# Altium PCB LST_UP.PcbDoc (part 6 of 6)
Units mil, origin at the board's own origin, x right, y up, seen from the top; angles counter-clockwise.
Board outline 4330.71 x 4330.71 mil, 2 copper layers (Top Layer, Bottom Layer), stack 50 mil thick; 469 components, 244 nets, 1341 pads, 140 vias.
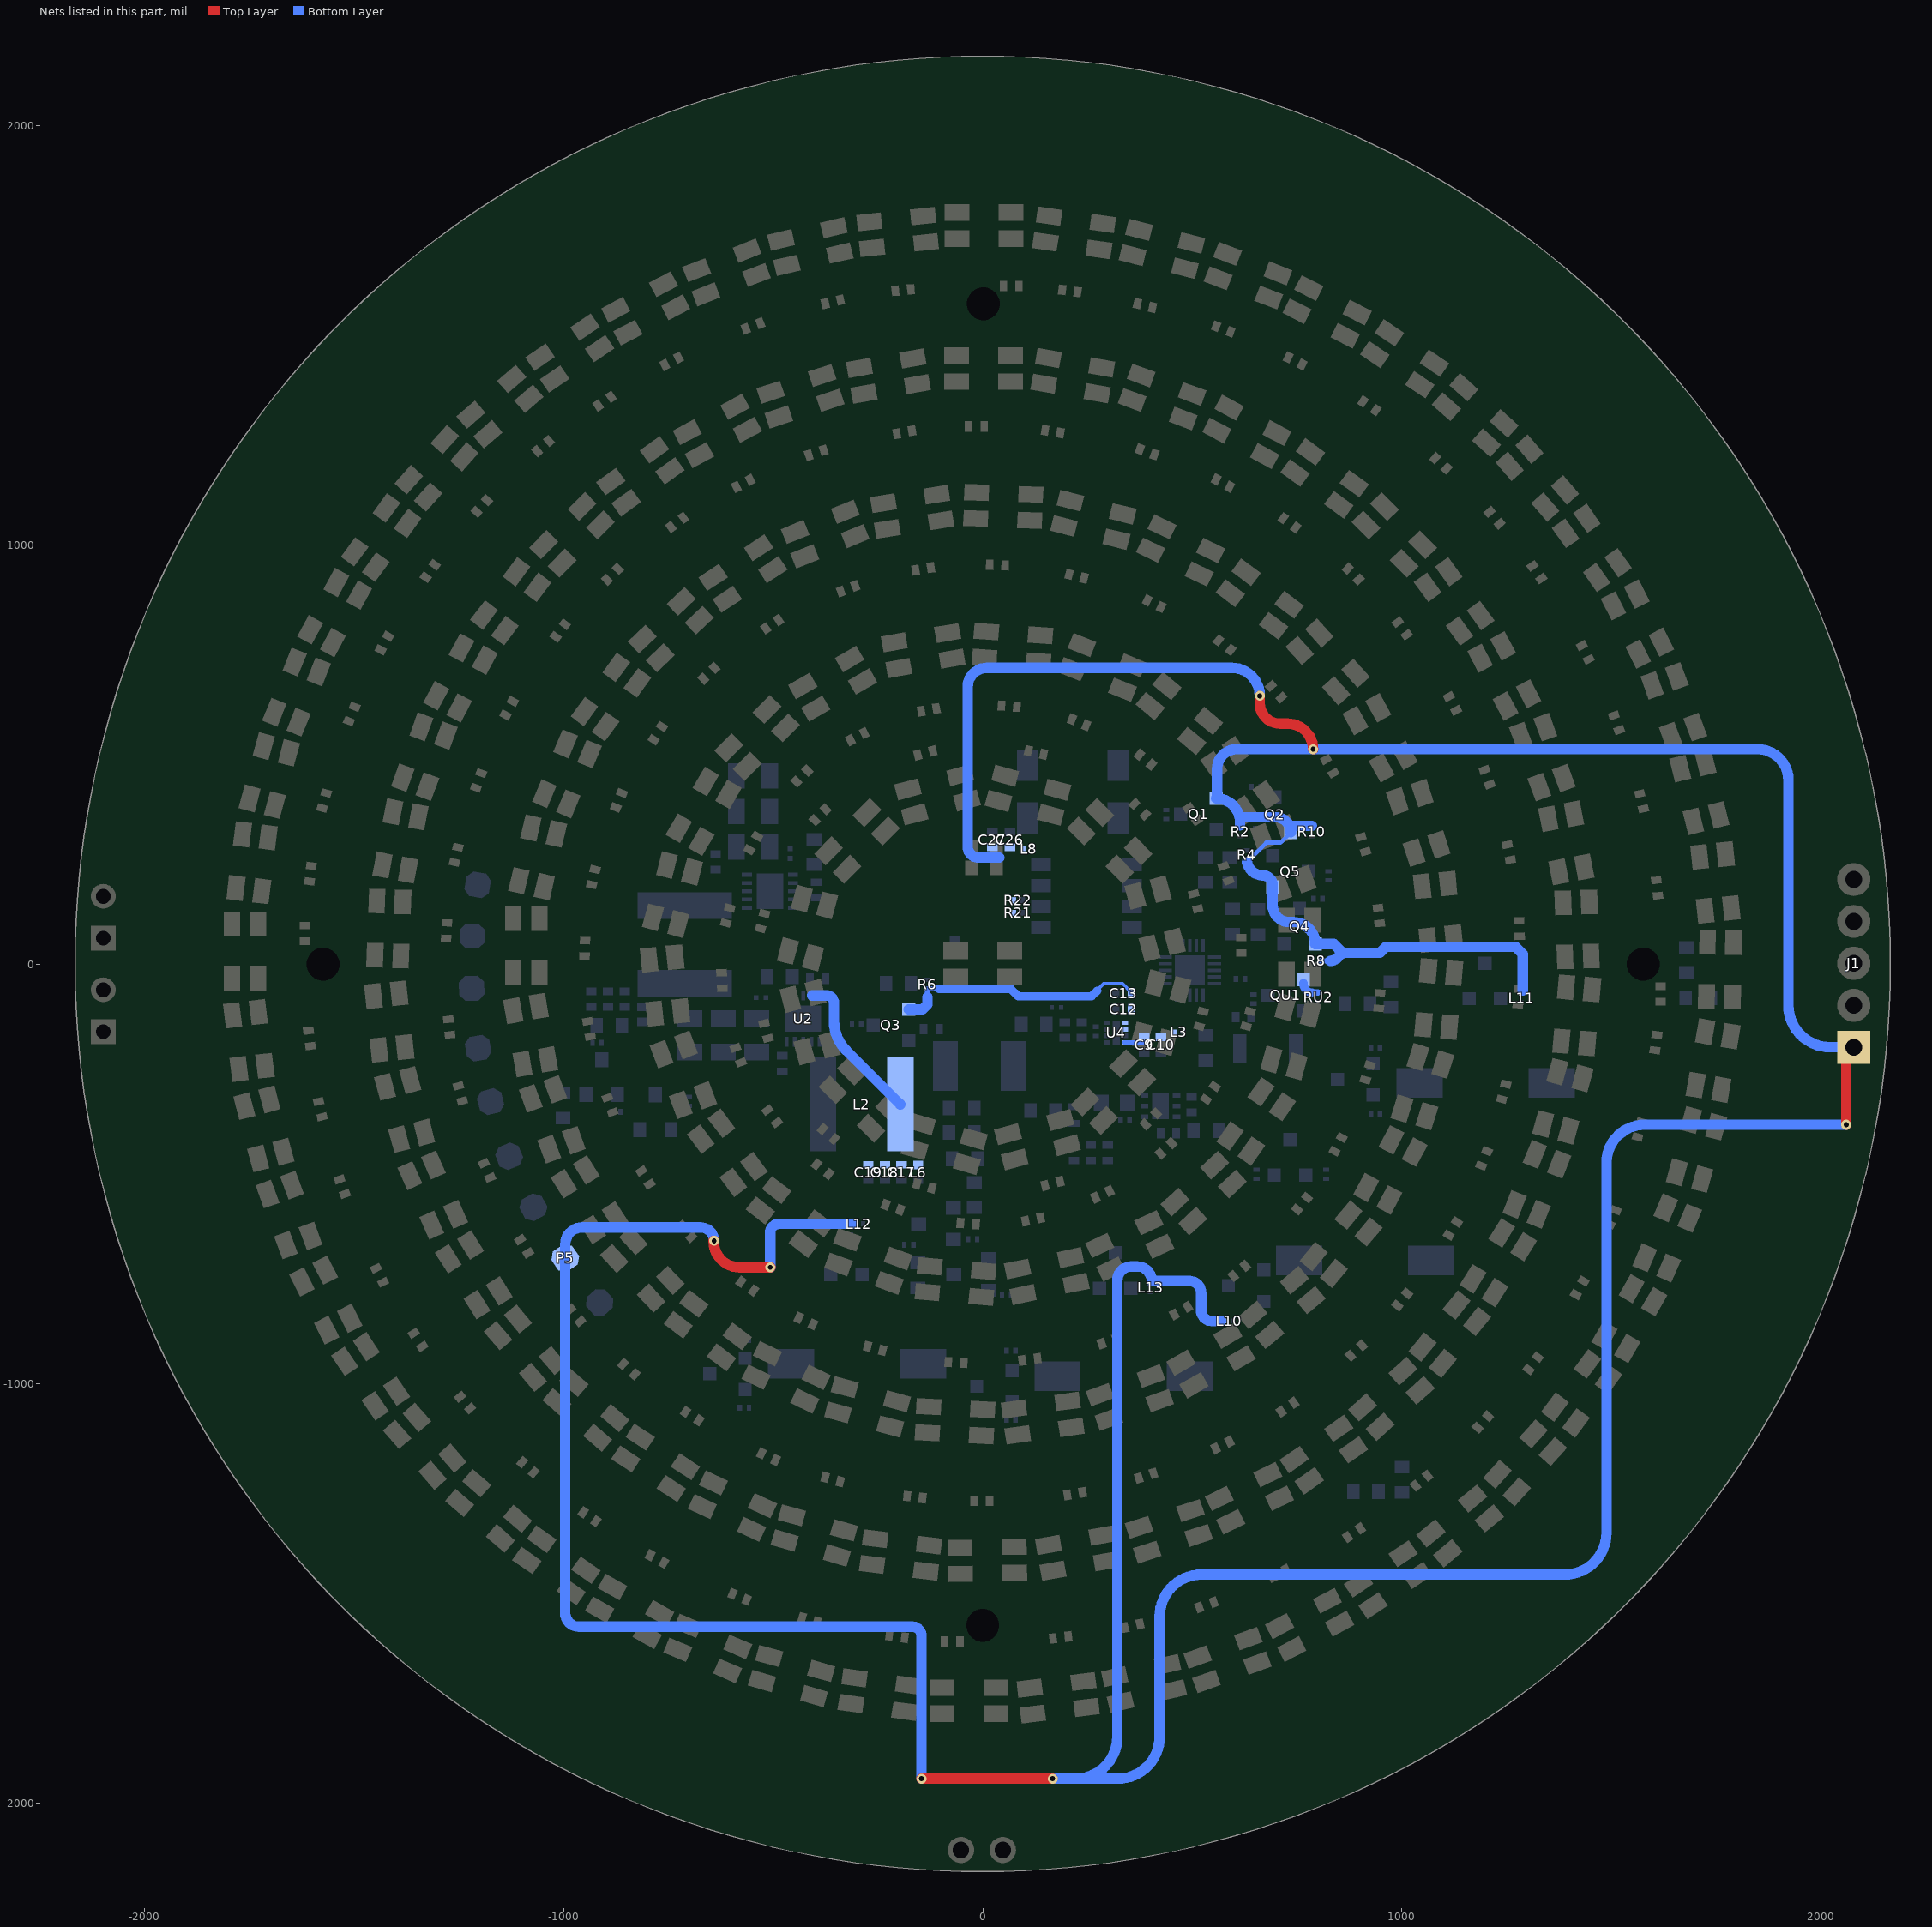
[diagram p5: the nets of this part, all layers, seen from the top]

## Via types
v1: diameter 23.62, hole 11.81, Top Layer to Bottom Layer, tented top, 92 vias
v2: diameter 23.62, hole 11.81, Top Layer to Bottom Layer, 48 vias

## Nets (pads, with @x,y where several pads share a name; then routed paths per layer and width w, separated by ;. In a path a pad name is that pad's centre, name@x,y a point inside that pad or via, vN(x,y) a via of type N, cw(c..) or ccw(c..) an arc to the next point about the centre after c; other vN are vias at no path point) (continued)
VDD: C9.2 C10.2 C12.2 C13.2 C26.2 C27.2 J1.1 L3.1 L8.1 L10.1 L11.1 L12.1 L13.1 P5.1 Q1.1 Q2.1 Q3.1 Q4.1 Q5.1 QU1.1 R2.1 R4.1 R6.1 R8.1 R10.1 R21.2 R22.2 RU2.1 U4.1 U4.2 U4.4 | length 14122
  Top Layer w25: v1(-641,-659.61) ccw(c-641,-660.61) -642,-660.61 ccw(c-580,-660.61) -580,-722.61 v1(-507,-722.61) ; v1(-146,-1942.61) v1(167,-1942.61) ; v1(661,640.39) 661,622.39 ccw(c709,622.39) 709,574.39 727,574.39 cw(c727,513.39) v1(788,513.39) ; v1(2060,-382.61) 2060,-215.61 cw(c2078,-215.61) J1.1@2078,-197.61
  Bottom Layer w8: 279,-55.61 288.38,-46.23 300,-46.23 333.2,-45.61 C13.2@354.23,-66.64
  Bottom Layer w10: U4.4@337,-186.36 U4.4@339,-186.36 385.75,-186.36 ; C13.2@354.23,-68.61 C13.2@354.23,-66.64 ; 638.23,252.07 676.28,290.12 710.06,290.12 Q2.1@734.8,314.87 ; Q5.1@691.68,184.49 Q5.1@691.68,188.39
  Bottom Layer w12: -132,-78 R6.1@-132,-58.44 -104.36,-58.44 ; QU1.1@765,-50.71 765,-44.71 QU1.1@765,-42.2 ; R8.1@806,8.39 828.9,8.39
  Bottom Layer w15: 785.43,-67.17 RU2.1@800,-67.17
  Bottom Layer w20: -104.36,-58.44 66.83,-58.44 84.39,-76 260,-76 273,-63 ; QU1.1@765,-44.71 ccw(c788.9,-44.71) 772,-61.61 ccw(c785.43,-48.18) 785.43,-67.17
  Bottom Layer w25: v1(-641,-659.61) ccw(c-673,-659.61) -673,-627.61 -956,-627.61 ccw(c-956,-667.61) -996,-667.61 P5.1@-996,-700.61 -996,-1547.58 ccw(c-963.58,-1547.58) -963.58,-1580 -168,-1580 cw(c-168,-1602) -146,-1602 v1(-146,-1942.61) ; v1(-507,-722.61) -507,-640 cw(c-486,-640) -486,-619 L12.1@-311,-619 ; Q3.1@-176.68,-107.2 -143.59,-107.2 -132,-95.61 -132,-78 ; 40,254.39 -9,254.39 cw(c-9,281.39) -36,281.39 -36,661.39 cw(c10,661.39) 10,707.39 594,707.39 cw(c594,640.39) v1(661,640.39) ; v1(167,-1942.61) 221.16,-1942.61 ; 569,-850.61 546,-850.61 cw(c546,-825.61) 521,-825.61 521,-783.26 ccw(c493.35,-783.26) 493.35,-755.61 403.46,-755.61 ccw(c368.46,-755.61) 368.46,-720.61 354.45,-720.61 ccw(c354.45,-753.9) 321.16,-753.9 321.16,-1842.61 cw(c221.16,-1842.61) 221.16,-1942.61 ; R2.1@614,331.29 614,339.02 ; 614,342.02 614,339.02 ; 630.6,243.39 ccw(c667.68,250.07) 667.68,212.39 cw(c667.68,188.39) 680.83,208.46 cw(c667.68,188.39) Q5.1@691.68,188.39 ; Q5.1@691.68,184.49 691.68,140.62 ccw(c731.32,140.62) 731.32,100.97 741.01,100.97 cw(c741.01,48.57) Q4.1@793.41,48.57 837.46,48.57 858.39,27.64 ; Q2.1@734.8,314.87 ccw(c698.63,314.87) 698.63,351.04 612.72,351.04 ; Q2.1@736,330.44 R10.1@785,330.44 ; 828.9,8.39 ccw(c828.9,33.11) 846.37,15.63 858.39,27.64 ; 1288.26,-62.34 1288.26,24.74 1271,42 962,42 947.64,27.64 858.39,27.64 ; v1(2060,-382.61) 1579,-382.61 ccw(c1579,-473.61) 1488,-473.61 1488,-1355.61 cw(c1388,-1355.61) 1388,-1455.61 522,-1455.61 ccw(c522,-1555.61) 422,-1555.61 422,-1842.61 cw(c322,-1842.61) 322,-1942.61 221.16,-1942.61 ; J1.1@2078,-197.61 2022,-197.61 cw(c2022,-97.61) 1922,-97.61 1922,439.39 ccw(c1848,439.39) 1848,513.39 v1(788,513.39) 606,513.39 ccw(c606,466.39) 559,466.39 559,398.02 cw(c557,398.02) Q1.1@557,396.02 cw(c557,339.02) 612.72,351.04 ; 612.72,351.04 cw(c557,339.02) 614,339.02
VIN: C17.1 C18.1 C19.1 L2.2 L6.2 U2.9 U2.10 | length 366.1
  Bottom Layer w25: U2.9@-407.15,-74.1 U2.10@-389,-74.1 -372.9,-74.1 cw(c-372.9,-92) -355,-92 -355,-134.58 ccw(c-255,-134.58) -347.59,-172.37 ccw(c-255,-134.58) -325.71,-205.29 -196.9,-334.1 L2.2@-196.48,-334.1
pads on no net: D1.3 D2.3 D3.3 D4.3 LED160.2 U1.8 U2.8 U3.20 U4.3

## Polygon pours and split planes (outlines as drawn)
GND on Bottom Layer "Polygonpour2" (hatched 45Degree grid 20 track 8, remove dead copper, pour order 8): -377.67,-2026.39 -631.31,-1961.39 -810.31,-1893.39 -972.31,-1811.39 -1166.31,-1692.39 -1305.31,-1580.39 -1441.31,-1456.39 -1553.31,-1311.39 -1544.31,-1348.39 -1616.31,-1253.39 -1741.06,-1076.39 -1876.31,-819.39 -1977.31,-528.39 -2030.31,-234.39 -2043.31,27.56 -2030.31,244.61 -1985.31,485.61 -1912.31,714.61 -1825.31,909.61 -1713.31,1106.61 -1500.31,1388.61 -1342.31,1546.61 -1118.31,1718.61 -838.71,1872.61 -516.31,1990.61 -326.31,2027.61 -65.32,2057.61 187.69,2054.61 435.69,2017.61 625.69,1970.61 776.69,1914.61 966.69,1828.61 1122.69,1740.61 1327.69,1593.61 1555.69,1375.61 1725.69,1158.61 1861.69,930.61 1978.69,648.59 2029.69,476.61 2060.69,297.8 2076.69,181.61 2083.69,-27.39 2070.69,-230.39 2040.69,-439.39 1930.69,-787.39 1828.69,-993.39 1732.69,-1152.39 1644.1,-1277.39 1479.69,-1462.39 1340.69,-1586.39 1147.69,-1732.39 950.76,-1841.39 817.69,-1895.39 584.69,-1987.39 297.69,-2044.39 120.69,-2063.39 -152.62,-2057.39 -349.31,-2027.39 -385.31,-2020.39 -383.31,-2020.39
no net on Bottom Layer "Bottom Layer-No Net" (solid, pour order 0): 265,-311.61
GND on Top Layer "Polygonpour1" (hatched 45Degree grid 20 track 8, remove dead copper, pour order 4): -385.36,-2034 -639,-1969 -818,-1901 -980,-1819 -1174,-1700 -1313,-1588 -1449,-1464 -1561,-1319 -1552,-1356 -1624,-1261 -1748.75,-1084 -1884,-827 -1985,-536 -2038,-242 -2051,19.95 -2038,237 -1993,478 -1920,707 -1833,902 -1721,1099 -1508,1381 -1350,1539 -1126,1711 -846.41,1865 -524,1983 -334,2020 -73.01,2050 180,2047 428,2010 618,1963 769,1907 959,1821 1115,1733 1320,1586 1548,1368 1718,1151 1854,923 1971,640.98 2022,469 2053,290.19 2069,174 2076,-35 2063,-238 2033,-447 1923,-795 1821,-1001 1725,-1160 1636.4,-1285 1472,-1470 1333,-1594 1140,-1740 943.07,-1849 810,-1903 577,-1995 290,-2052 113,-2071 -160.31,-2065 -357,-2035 -393,-2028 -391,-2028

## Other copper
Bottom Layer:
  rectangle net VDD: 55.61,-67 82,180
  rectangle net V_BAT: 70.32,-216 115,-121
  rectangle net LED_IN: -294,-162.74 -245,-127
  rectangle net VDD: 335,-157 353,-128
  rectangle net VDD: 335,-157 364,-53
  rectangle net V_MCU: 182,-157 300,-95
  rectangle net GND: -217,-839 -130,-751
  rectangle net GND: -216,-788 -181,-503
  rectangle net GND: -287.59,-557 -182,-503
  rectangle net V_O1: -174,-735 -130,-502
  rectangle net VIN: -286,-493 -142,-220
  rectangle net GND: -734,-161 -386,-95.61
  rectangle net GND: -543,131.39 -474,479.39
  rectangle net GND: 408,-325 514,-302.61
  rectangle net GND: 403,-479.61 444,-302.61
  rectangle net GND: 205,-490.61 445,-459.61
  rectangle net VDD: 33,169.39 106,296
  rectangle net VDD: 9,241 81,295.39
  rectangle net GND: 10,305.79 139.28,515.39
  rectangle net V_OUT_2: -736,244 -560,479.39
  rectangle net GND: 176,-220.61 251,-165
  rectangle net GND: 194,-218.61 324,-185
  rectangle net GND: 196,-220.61 472,-199.61
  rectangle net VDD: 354,-191.61 465,-147
  rectangle net V_OUT_1: -454,-271.44 -424,-172
  rectangle net V_OUT_1: -524,-281 -424,-234.61
  rectangle net V_OUT_1: -735,-281 -504,-171.61
  rectangle net BAT_IN: -122,-432.61 -58,-120.61
  rectangle net V_BAT: -43,-551.61 129,-179
  rectangle net V_TR_O: 451,-417.72 527,-333
  rectangle net V_TR: 265,-386.61 319,-307.61
  rectangle net V_TR: 203,-442.61 335,-358

## Silkscreen, mask and mechanical layers (free items; w line width, h text height)
Top Overlay:
  text "@" at -125,1599.39 h40 r95
  text "@" at 129,1598.39 h40 r88
  text "@" at 269,1581.39 h40 r82
  text "@" at -293,1576.39 h40 r100
  text "@" at 443,1541.39 h40 r76
  text "@" at -482,1530.39 h40 r109
  text "@" at 628,1477.39 h40 r69
  text "@" at -678,1454.39 h40 r117
  text "@" at 795,1395.39 h40 r63
  text "@" at -843,1363.39 h40 r122
  text "@" at 959,1283.39 h40 r56
  text "@" at 46,1266.39 h40 r88
  text "@" at -989,1262.39 h40 r129
  text "@" at -124,1260.39 h40 r95
  text "@" at 227,1246.39 h40 r80
  text "@" at -333,1222.39 h40 r105
  text "@" at 444,1185.39 h40 r70
  text "@" at -508,1160.39 h40 r113
  text "@" at 1126,1141.39 h40 r48
  text "@" at -1139,1127.39 h40 r134
  text "@" at 619,1105.39 h40 r62
  text "@" at -669,1074.39 h40 r120
  text "@" at 1249,1007.39 h40 r41
  text "@" at 772,1003.39 h40 r54
  text "@" at -1270,978.39 h40 r143
  text "@" at -822,965.39 h40 r130
  text "@" at -78,935.09 h40 r96
  text "@" at 98,933.39 h40 r85
  text "@" at -257,901.39 h40 r108
  text "@" at 282,894.39 h40 r76
  text "@" at 917,876.39 h40 r45
  text "@" at 1344,873.39 h40 r35
  text "@" at -957,829.39 h40 r140
  text "@" at -439,828.39 h40 r120
  text "@" at 457.84,817.39 h40 r62
  text "@" at -1383,813.39 h40 r150
  text "@" at 1024,743.39 h40 r36
  text "@" at -594,722.39 h40 r130
  text "@" at 613,710.39 h40 r53
  text "@" at 1452,681.39 h40 r27
  text "@" at -1082,659.39 h40 r152
  text "@" at -1466,646.39 h40 r156
  text "@" at -66,602.39 h40 r97
  text "@" at 123,593.7 h40 r85
  text "@" at 726,592.39 h40 r40
  text "@" at -728,590.39 h40 r145
  text "@" at 1135,560.39 h40 r28
  text "@" at -238,557.39 h40 r117
  text "@" at 280,538.39 h40 r65
  text "@" at 1519,512.39 h40 r20
  text "@" at -72,501.67 h40 r100
  text "@" at -1167,491.39 h40 r160
  text "@" at 181,475.39 h40 r70
  text "@" at -378,473.39 h40 r130
  text "@" at -1538,445.39 h40 r163
  text "@" at -829,441.39 h40 r158
  text "@" at 424,436 h40 r50
  text "@" at 842,408.39 h40 r29
  text "@" at -331.03,386.39 h40 r130
  text "@" at 1208,379.39 h40 r18
  text "@" at -503,341.39 h40 r150
  text "@" at 1571,323.39 h40 r14
  text "@" at -1225,320.39 h40 r167
  text "@" at 406,314 h40 r45
  text "@" at 524,299.39 h40 r35
  text "@" at -1581,274.39 h40 r170
  text "@" at -897,264.39 h40 r166
  text "@" at 909,221.39 h40 r18
  text "@" at 1251,204.39 h40 r10
  text "@" at -581,173.39 h40 r165
  text "@" at -492,158.39 h40 r165
  text "@" at 586,154.39 h40 r20
  text "@" at -1259,140.39 h40 r177
  text "@" at -1597,136.39 h40 r176
  text "@" at 1599,118.39 h40 r6
  text "@" at -931,99.39 h40 r178
  text "@" at 504,85.39 h40 r10
  text "@" at 935,52.39 h40 r6
  text "@" at 1266,25.39 h40
  text "@" at -607,24.39 h40 r183
  text "@" at 603,-14.61 h40
  text "@" at -1261,-81.61 h40 r186
  text "@" at -933,-91.61 h40 r188
  text "@" at -514,-92.61 h40 r195
  text "@" at -1595,-113.61 h40 r183
  text "@" at 1598,-132.61 h40
  text "@" at 1257,-134.61 h40 r350
  text "@" at 924,-147.61 h40 r355
  text "@" at -590,-154.61 h40 r197
  text "@" at 599,-185.61 h40 r345
  text "@" at 487,-187 h40 r345
  text "@" at -1243,-242.61 h40 r193
  text "@" at 1580,-246.61 h40 r352
  text "@" at -897,-270.61 h40 r200
  text "@" at -1578,-281.61 h40 r193
  text "@" at -523,-303.61 h40 r212
  text "@" at 883,-313.61 h40 r343
  text "@" at 492,-343.61 h40 r325
  text "@" at -402,-351 h40 r225
  text "@" at 1213,-358.61 h40 r345
  text "@" at 343,-400.61 h40 r315
  text "@" at -1190,-429.61 h40 r200
  text "@" at -418,-437 h40 r230
  text "@" at -821,-444.61 h40 r210
  text "@" at 1534,-448.61 h40 r345
  text "@" at -1533,-468.61 h40 r200
  text "@" at 381,-468.61 h40 r313
  text "@" at 804,-477.61 h40 r332
  text "@" at -194,-493.61 h40 r254
  text "@" at 1158,-514.61 h40 r338
  text "@" at 103,-520.61 h40 r280
  text "@" at -264,-541.61 h40 r245
  text "@" at 224,-561.61 h40 r295
  text "@" at -739,-580.61 h40 r225
  text "@" at -92,-594.61 h40 r261
  text "@" at 58,-601.61 h40 r276
  text "@" at -1110,-606.61 h40 r210
  text "@" at 708,-606.61 h40 r318
  text "@" at 1462,-653.61 h40 r335
  text "@" at 1069,-672.61 h40 r328
  text "@" at -1453,-679.61 h40 r207
  text "@" at -602,-715.75 h40 r230
  text "@" at 552,-757.61 h40 r310
  text "@" at -999,-778.61 h40 r220
  text "@" at -470,-808.61 h40 r245
  text "@" at 1378,-815.61 h40 r329
  text "@" at -1366,-833.61 h40 r210
  text "@" at 949,-835.61 h40 r321
  text "@" at 410,-841.61 h40 r300
  text "@" at -312,-882 h40 r250
  text "@" at 236,-901.61 h40 r286
  text "@" at -874,-915.61 h40 r225
  text "@" at -123,-928.7 h40 r260
  text "@" at 50,-937.61 h40 r278
  text "@" at 833,-951.61 h40 r312
  text "@" at -1262,-986.61 h40 r220
  text "@" at 1261,-987.61 h40 r322
  text "@" at -736,-1028.61 h40 r237
  text "@" at 668,-1075.61 h40 r302
  text "@" at 1138,-1127.61 h40 r318
  text "@" at -559,-1132.61 h40 r245
  text "@" at -1122,-1147.61 h40 r228
  text "@" at 510,-1159.61 h40 r296
  text "@" at -412,-1195.61 h40 r254
  text "@" at 327,-1222.61 h40 r286
  text "@" at -222,-1245.61 h40 r260
  text "@" at 157,-1256.61 h40 r277
  text "@" at 991,-1258.61 h40 r309
  text "@" at -62,-1263.61 h40 r268
  text "@" at -980,-1268.61 h40 r235
  text "@" at -823,-1374.61 h40 r240
  text "@" at 825,-1374.61 h40 r300
  text "@" at 646,-1467.61 h40 r297
  text "@" at -634,-1471.61 h40 r249
  text "@" at -468,-1530.61 h40 r253
  text "@" at 468,-1532.61 h40 r289
  text "@" at 294,-1574.61 h40 r279
  text "@" at -263,-1578.61 h40 r260
  text "@" at -136,-1596.61 h40 r268
  text "@" at 124,-1596.61 h40 r275
Bottom Overlay:
  lines w10: -468,327 -458,337 ; -458,294 -458,337 ; -448,327 -458,337 ; 281,-111 289,-111 297,-119
  text "* >> 10K" at 2032,458 h80
  text "#" at -641,454.39 h40
  text "*" at 692,437 h60 r90
  text "@ >> 100nf" at 2032,394.39 h80
  text "*" at 468,381.39 h60 r90
  text "#" at -641,369.39 h40
  text "$" at 33,366 h40 r180
  text "*" at 644,339 h60 r90
  text "*" at 815,339 h60 r90
  text "# >> 1uf" at 2032,316 h80
  text "#" at -641,288.39 h40
  text "*" at 659,219 h60 r90
  text "*" at 878,192 h60 r90
  text "GND" at -1261,184.39 h60 r350
  text "GND" at 2027,173.39 h80
  text "*" at 126,168 h60 r90
  text "*" at 862,146 h60 r90
  text "*" at 125.64,88.75 h60 r90
  text "RESET#" at 2026,68.37 h80
  text "GND" at -1271,50.77 h60
  text "*" at 857,-1 h60 r90
  text "$" at -860,-38.02 h40
  text "*" at -79,-45.92 h60 r90
  text "RX" at 2036,-47.58 h80
  text "*" at 820,-54 h40 r90
  text "VCC_L2" at -1271,-74.61 h60 r2
  text "$" at 376,-79.61 h40
  text "*" at 654,-102 h60 r90
  text "*" at 300,-138 h60 r90
  text "$" at 416,-147.61 h40
  text "TX" at 2036,-152.59 h80
  text "*" at -281,-174 h60 r90
  text "*" at -923,-196 h60 r90
  text "*" at 998,-207 h60 r90
  text "$" at -149,-210.61 h40
  text "VCC_L1" at -1254,-222.61 h60 r10
  text "$" at 183,-225.61 h40
  text "VDD" at 2026,-247.61 h80
  text "#" at -688,-270.61 h40
  text "#" at -608,-270.61 h40
  text "#" at -527,-270.61 h40
  text "BAT_IN" at -1223,-355.61 h60 r15
  text "$" at 531,-358.61 h40
  text "*" at -877,-362 h60 r90
  text "*" at -671,-370.62 h60 r90
  text "*" at 378,-404.61 h60 r90
  text "$" at 173,-454.61 h40
  text "V_BAT" at -1173,-489.61 h60 r22
  text "*" at 849,-542 h60 r90
  text "$" at -286,-571 h40
  text "VCC" at -1107,-626.61 h60 r29
  text "*" at 37,-665 h60 r90
  text "*" at -179,-679 h60 r90
  text "VDD" at -1027,-749.61 h60 r35
  text "*" at 118,-798 h60 r90
  text "CLK_OUT" at -942,-854.61 h60 r42
  text "*" at -571,-905 h60 r90
  text "*" at 66,-930 h60 r90
  text "BATTERY" at 153,-2054.61 h75
  text "-VE" at -113,-2132.61 h80
  text "+VE" at 236,-2132.61 h80
Mechanical 1:
  circle w10: c0,1 r314.96
  circle w10: c-1,-12.61 r511.81
  circle w10: c0,1 r645.67
  circle w10: c0,1 r842.52
  circle w10: c0,1 r976.38
  circle w10: c0,1 r1173.23
  circle w10: c0,1 r1307.09
  circle w10: c0,0 r1503.94
  circle w10: c0,1 r1643.7
  circle w10: c0,1 r1840.55
  circle w10: c16,-10 r2065.35
  lines w10: -2164,0 0,0 ; 0,-2164.61 0,0 ; 0,2167.39 0,0 ; 2164.61,0 0,0
Mechanical 2:
  circle w10: c0,1 r2165.35
  lines w10: -204,19 -123,19 -123,93 -204,93 -204,19 ; -40,-152 -40,-78 41,-78 41,-152 -40,-152 ; -40,81 41,81 41,155 -40,155 -40,81